# Altium PCB main.PcbDoc
Units mm, origin at the board's own origin, x right, y up, seen from the top; angles counter-clockwise.
Board outline 45 x 95 mm, 2 copper layers (Top Layer, Bottom Layer); 5 components, 3 nets, 92 pads, 197 vias.
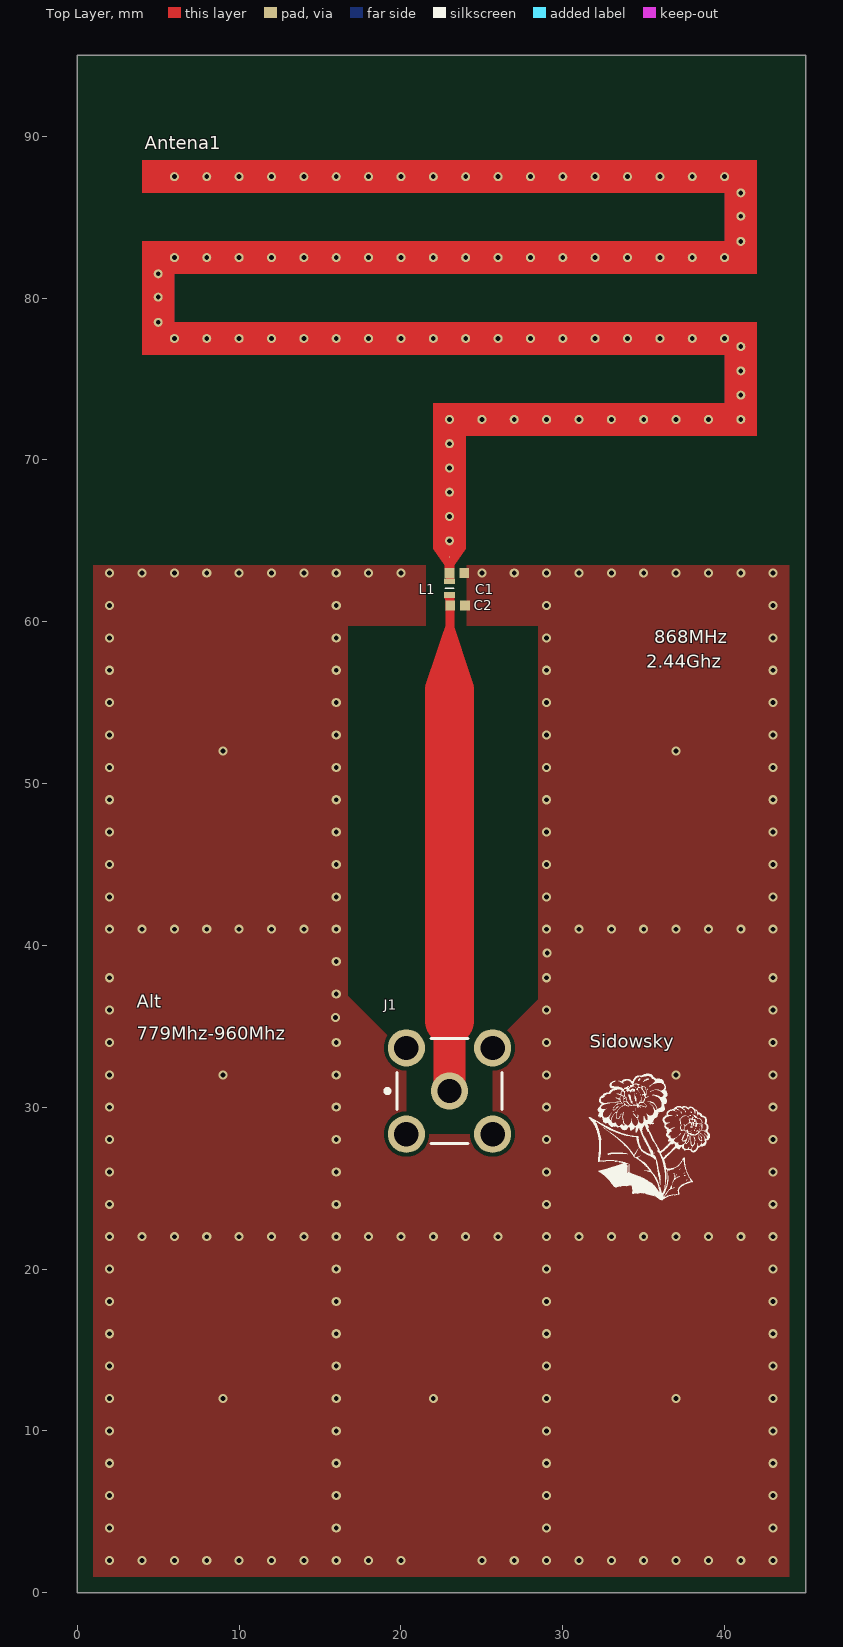
[diagram p0: Top Layer view]
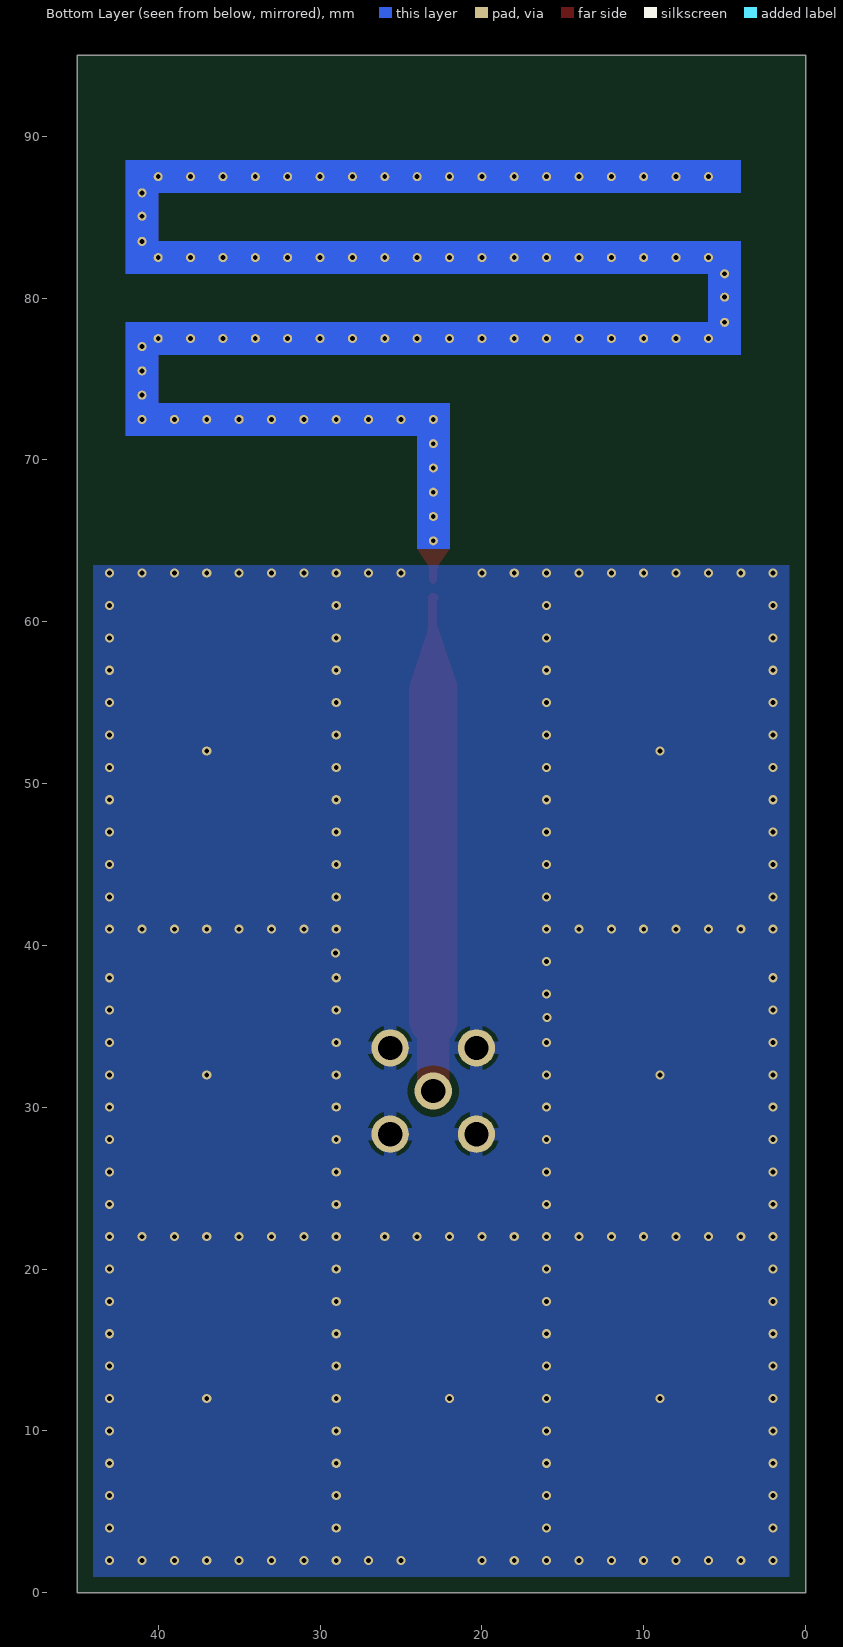
[diagram p1: Bottom Layer view, seen from below]

## Layer stack, top to bottom
Top Solder: solder mask 0.0102, Solder Resist, Dk 3.5
Top Layer: signal copper 0.0356
Dielectric 1: dielectric 0.32, FR-4, Dk 4.8
Bottom Layer: signal copper 0.0356
Bottom Solder: solder mask 0.0102, Solder Resist, Dk 3.5

## Board outline
0,0 45,0 45,95 0,95

## Design rules (kind name [scope] priority, off if disabled: settings)
AcuteAngle [All] p1: minimum=4.00000000000000E+0001 checktracksonly=TRUE
BoardOutlineClearance [All] p1: gap=0.2 ignorepadtopadclearanceinfootprint=FALSE
Clearance [All] p1: gap=0.2 ignorepadtopadclearanceinfootprint=TRUE except(0.002: Text-Text Text-Hole; 0.1: Arc-SMDPad Arc-Via Track-SMDPad Track-Via SMDPad-SMDPad SMDPad-Via THPad-Via Via-Via; 0.15: Arc-Arc Arc-Track Arc-THPad Arc-Text Arc-Hole Track-Track Track-THPad Track-Text Track-Hole SMDPad-THPad SMDPad-Text SMDPad-Hole THPad-THPad THPad-Text THPad-Hole Via-Text Via-Hole Fill-Text Fill-Hole Poly-Text Poly-Hole Region-Text Region-Hole)
ComponentClearance [All] p1: gap=0 collisioncheckmode=3 verticalgap=0 showdistances=FALSE
Creepage [All] p1: checkdistance=0.4 applytopolygonpour=TRUE
DiffPairsRouting [All] p1: maxlimit=0.254 minlimit=0.2 mostfreqgap=0.2 toplayer_minwidth=0.2 toplayer_maxwidth=0.381 toplayer_prefwidth=0.2 bottomlayer_minwidth=0.2 bottomlayer_maxwidth=0.381 bottomlayer_prefwidth=0.2 maxuncoupledlength=12.7
HoleSize [All] p1: absolutevalues=TRUE maxlimit=6.5 minlimit=0.1 maxpercent=80.000 minpercent=20.000
HoleToHoleClearance [All] p1: gap=0.2 allowstackedmicrovias=TRUE
MaximumViaCount [All] p1: limit=1500
MinimumSolderMaskSliver [All] p1: minsoldermaskwidth=0
PlaneClearance [All] p1: clearance=0.05
PlaneConnect PlaneConnect_1 [All] p1: planeconnectstyle=Direct reliefexpansion=0.508 reliefentries=4 reliefconductorwidth=0.8 reliefairgap=0.2
PolygonConnect PolygonConnect_1 [All] p1: thpad.connectstyle=Relief thpad.reliefconductorwidth=0.8 thpad.reliefentries=4 thpad.polygonreliefangle="90 Angle" thpad.airgapwidth=0.254 smdpad.connectstyle=Direct smdpad.reliefconductorwidth=0.2 smdpad.reliefentries=4 smdpad.polygonreliefangle="90 Angle" smdpad.airgapwidth=0.1 via.connectstyle=Direct via.reliefconductorwidth=0.254 via.reliefentries=4 via.polygonreliefangle="45 Angle" via.airgapwidth=0.254
RoutingCorners [All] p1: cornerstyle=45-Degree minsetback=1.27 maxsetback=1.27
RoutingTopology [All] p1: topology=Daisy_Balanced
RoutingVias [All] p1: holewidth=0.3 width=0.5 viastyle="Through Hole" minholewidth=0.3 minwidth=0.41 maxholewidth=3.5 maxwidth=5
SilkToSilkClearance [All] p1: silktosilkclearance=0.15
SilkToSolderMaskClearance [IsPad] p1: minsilkscreentomaskgap=0.02 clearancetoexposedcopper=TRUE
SolderMaskExpansion SolderMaskExpansion_1 [All] p1: expansion=0.09 istentingtop=FALSE
SupplyNets "Schematic Supply Nets" [InNet('GND')] p1: voltage=0.000
UnConnectedPin UnConnectedPin_1 [InNetClass('No Connect')] p1:
UnRoutedNet [All] p1: checkbadconnections=TRUE
Width [All] p1: maxlimit=3 minlimit=0.2 preferedwidth=2.1
18 further rules are at their usual default settings.

## Classes and differential pairs
component class main: Antena1 C1 J1 L1

## Components (designator, comment, footprint, x,y, rotation, side; value= is the part's Value field where it differs from the comment)
Antena1 "866MHZ-2.444Ghz" ANTENA 23,63.5 r0 top (schematic designator Antena)
C1 "GRM1555C1H2R7CZ01D" CAPC1005X70N 23.46,63 r0 top (schematic designator C2)
C2 "GRM1555C1H2R7CZ01D" CAPC1005X70N 23.5,61 r0 top
J1 "SMA-J-P-H-ST-MT1" FP-SMA-J-P-H-ST-MT1-MFG 23,31 r0 top
L1 "LQG15WH0N7B02D" LQG15WH0N7B02D 23,62.5 r270 top (schematic designator L2)

## Footprints (in the part's own frame and the unit in brackets; to place one, negate y for a bottom-side part, rotate by r counter-clockwise, add the part's x,y. Pads: shape width x height; smd on the part's side, far side on the other; paste and mask are expansions set on the pad)
ANTENA [mm] "alt 779-960Mhz / 868Mhz / 2440Mhz"
  round 0.56 hole 0.3 mask+0.102: 1(-18,15) 1(-18,16.556) 1(-18,18) 1(-17,14) 1(-17,19) 1(-17,24) 1(-15,14) 1(-15,19) 1(-15,24) 1(-13,14) 1(-13,19) 1(-13,24) 1(-11,14) 1(-11,19) 1(-11,24) 1(-9,14) 1(-9,19) 1(-9,24) 1(-7,14) 1(-7,19) 1(-7,24) 1(-5,14) 1(-5,19) 1(-5,24) 1(-3,14) 1(-3,19) 1(-3,24) 1(-1,14) 1(-1,19) 1(-1,24) 1(0,1.5) 1(0,3) 1(0,4.5) 1(0,6) 1(0,7.5) 1(0,9) 1(1,14) 1(1,19) 1(1,24) 1(2,9) 1(3,14) 1(3,19) 1(3,24) 1(4,9) 1(5,14) 1(5,19) 1(5,24) 1(6,9) 1(7,14) 1(7,19) 1(7,24) 1(8,9) 1(9,14) 1(9,19) 1(9,24) 1(10,9) 1(11,14) 1(11,19) 1(11,24) 1(12,9) 1(13,14) 1(13,19) 1(13,24) 1(14,9) 1(15,14) 1(15,19) 1(15,24) 1(16,9) 1(17,14) 1(17,19) 1(17,24) 1(18,9) 1(18,10.5) 1(18,12) 1(18,13.5) 1(18,20) 1(18,21.556) 1(18,23)
  round 0.025 smd mask+0.102: 1(0,0.5)
  round 0.025 smd paste-2539.97 mask+0: 1(0,13)
  round 0.025 smd far side mask+0: 1(0,13)
  Top Layer region: -1,1 1,1 1,8 19,8 19,15 -17,15 -17,18 19,18 19,25 -19,25 -19,23 17,23 17,20 -19,20 -19,13 17,13 17,10 -1,10
  Top Layer region: -1,1 -0.3,0 0.3,0 1,1 -0.3,1
  Bottom Layer region: -1,1 1,1 1,8 19,8 19,15 -17,15 -17,18 19,18 19,25 -19,25 -19,23 17,23 17,20 -19,20 -19,13 17,13 17,10 -1,10
CAPC1005X70N [mm]
  rect 0.6x0.62 smd: 1(-0.46,0) 2(0.46,0)
  body extent -0.5,-0.25 0.5,0.25, height 0.5
FP-SMA-J-P-H-ST-MT1-MFG [mm]
  round 1.73 smd paste+0 mask+0: 1(0,0)
  round 2.3 hole 1.5 paste-2539.97 mask+0: 2(-2.665,2.665) 3(2.665,2.665) 4(-2.665,-2.665) 5(2.665,-2.665)
  silkscreen extent -3.96,-3.24 3.24,3.24, body extent -3.92,-3.92 3.92,3.92, height 0.25
LQG15WH0N7B02D [mm]
  rect 0.35x0.65 smd: 1(0,0) 2(0.85,0)
  silkscreen extent 0.43,-0.25 0.43,0.25, body extent -0.07,-0.25 0.92,0.25, height 0.55

## Part data
Antena1: library part Antena
C1 C2: "Capacitor", Manufacturer_Name="Murata Electronics", Mouser Part Number=81-GRM36C2R7C50, Datasheet Link=http://www.murata.com/~/media/webrenewal/support/library/catalog/products/capacitor/mlcc/c02e.pdf, Height=0.7mm, Manufacturer_Part_Number=GRM1555C1H2R7CZ01D, Mouser Price/Stock=https://www.mouser.com/Search/Refine.aspx?Keyword=81-GRM36C2R7C50
J1: library part CMP-02754-000007-1, "CONN SMA JACK STR 50 OHM SMD", Case/Package=SMA, Dielectric Material=PTFE, Housing Color=Gold, Max Frequency=20GHz, Max Operating Temperature=125°C, Min Operating Temperature=-65°C, Voltage Rating=335V, Body Material=Brass, Body Plating=Gold, Center Contact Plating=Gold, Connector Type=SMA, Contact Material="Copper Alloy", Contact Plating=Gold, Fastening Type=Threaded, Impedance=50R, Mount="Surface Mount", Number of Ports=1, Packaging=Bulk, RoHS Compliant=No, Series=-, Termination=Solder

## Via types
v1: diameter 0.56, hole 0.3, Top Layer to Bottom Layer, tented both sides, 196 vias
v2: diameter 2.3, hole 1.5, Top Layer to Bottom Layer, 1 vias

## Nets (pads, with @x,y where several pads share a name; then routed paths per layer and width w, separated by ;. In a path a pad name is that pad's centre, name@x,y a point inside that pad or via, vN(x,y) a via of type N, cw(c..) or ccw(c..) an arc to the next point about the centre after c; other vN are vias at no path point)
GND: C1.2 C2.2 J1.2 J1.3 J1.4 J1.5
  other v1: 2,2 4,2 6,2 8,2 10,2 12,2 14,2 16,2 18,2 20,2 25,2 27,2 29,2 31,2 33,2 35,2 37,2 39,2 41,2 43,2 2,4 16,4 29,4 43,4 2,6 16,6 29,6 43,6 2,8 16,8 29,8 43,8 2,10 16,10 29,10 43,10 2,12 9,12 16,12 22,12 29,12 37,12 43,12 2,14 16,14 29,14 43,14 2,16 16,16 29,16 43,16 2,18 16,18 29,18 43,18 2,20 16,20 29,20 43,20 2,22 2,22 4,22 6,22 8,22 10,22 12,22 14,22 16,22 16,22 18,22 20,22 22,22 24,22 26,22 29,22 31,22 33,22 35,22 37,22 39,22 41,22 43,22 2,24 16,24 29,24 43,24 2,26 16,26 29,26 43,26 2,28 16,28 29,28 43,28 2,30 16,30 29,30 43,30 2,32 9,32 16,32 29,32 37,32 43,32 2,34 16,34 29,34 43,34 15.965,35.548 2,36 29,36 43,36 16,37 2,38 29,38 43,38 16,39 29.038,39.531 2,41 4,41 6,41 8,41 10,41 12,41 14,41 16,41 29,41 31,41 33,41 35,41 37,41 39,41 41,41 43,41 2,43 16,43 29,43 43,43 2,45 16,45 29,45 43,45 2,47 16,47 29,47 43,47 2,49 16,49 29,49 43,49 2,51 16,51 29,51 43,51 9,52 37,52 2,53 16,53 29,53 43,53 2,55 16,55 29,55 43,55 2,57 16,57 29,57 43,57 2,59 16,59 29,59 43,59 2,61 16,61 29,61 43,61 2,63 4,63 6,63 8,63 10,63 12,63 14,63 16,63 18,63 20,63 25,63 27,63 29,63 31,63 33,63 35,63 37,63 39,63 41,63 43,63
NetAntena1_1: Antena1.1 C1.1 L1.1 | length 2.4
  Top Layer w0.5: Antena1.1@23,65 23,64 C1.1 23.019,63 L1.1@23.019,62.595
NetC2_1: C2.1 J1.1 L1.2 | length 29
  Top Layer w0.55: L1.2@22.959,61.49 23.04,61.49 C2.1 23.04,57.258
  Top Layer w2: v2(23,31) 23,35.275
  Top Layer w3: 23,35.334 23,55.753

## Polygon pours and split planes (outlines as drawn)
GND on Top Layer "VCC" (solid, pour order 1): 1,63.5 44,63.5 44,1 1,1
no net on Top Layer "VCC" (solid, pour order 2): 22,56 23,56 24,56
GND on Bottom Layer "VCC" (solid, pour order 0): 1,63.5 44,63.5 44,1 1,1

## Other copper
Top Layer:
  region net NetC2_1: 24.5,56 21.5,56 23,60.5
  pour cut-out: 21.536,59.75 16.707,59.75 16.707,36.897 17.707,35.897 19.008,34.597 20.042,33.562 25.372,33.562 26.707,34.897 27.707,35.897 28.472,36.662 28.472,59.75 24.063,59.75 24.063,63.501 21.536,63.501
  pour cut-out: 20.335,33.665 20.335,28.335 25.665,28.335 25.665,33.665

## Silkscreen, mask and mechanical layers (free items; w line width, h text height)
Top Overlay:
  drawing of 27 lines, arcs and shapes, not listed
  text "868MHz" at 35.66,58.66 h0.81
  text "2.44Ghz" at 35.16,57.16 h0.81
  text "Alt" at 3.66,36.16 h0.81
  text "779Mhz-960Mhz" at 3.66,34.16 h0.81
  text "Sidowsky" at 31.66,33.68 h0.81